# Altium PCB EthereCAT_to_CAN.PcbDoc (part 2 of 3)
Units mil, origin at the board's own origin, x right, y up, seen from the top; angles counter-clockwise.
Board outline 2515.04 x 1574.83 mil, 4 copper layers (Top Layer, L2-G, L3-V, Bottom Layer), stack 23.756 mil thick; 178 components, 102 nets, 583 pads, 389 vias.
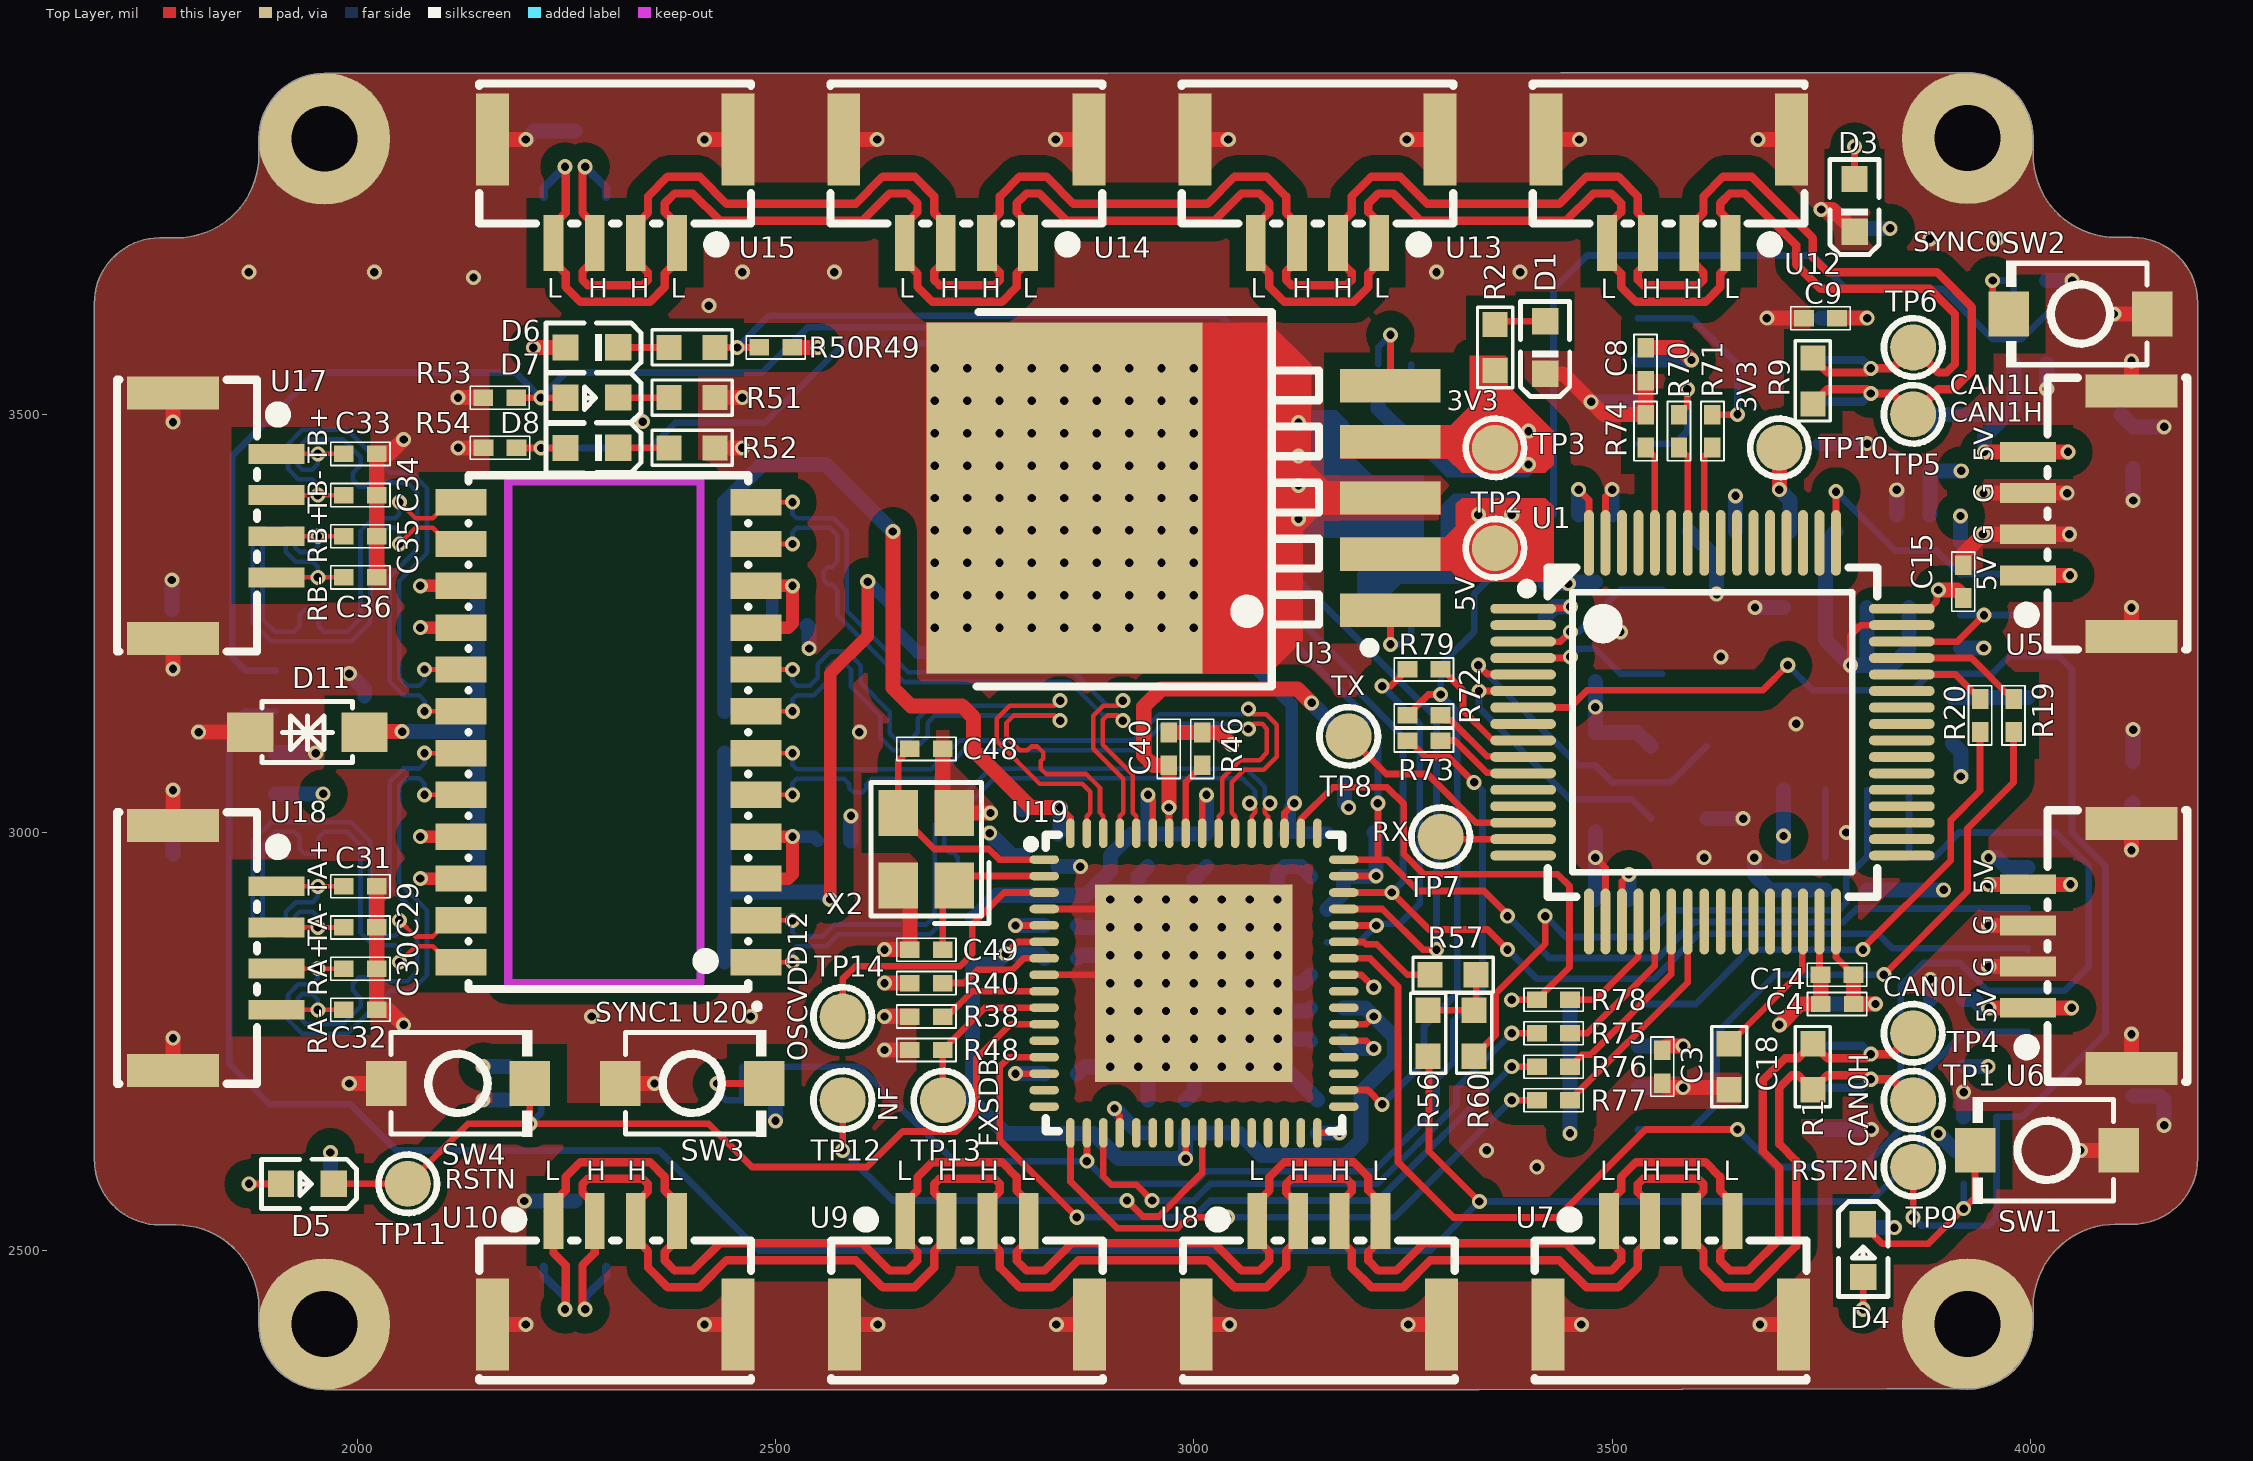
[diagram p0: Top Layer view]

## Via types
v1: diameter 18, hole 10, Top Layer to Bottom Layer, tented both sides, 389 vias

## Nets (pads, with @x,y where several pads share a name; then routed paths per layer and width w, separated by ;. In a path a pad name is that pad's centre, name@x,y a point inside that pad or via, vN(x,y) a via of type N, cw(c..) or ccw(c..) an arc to the next point about the centre after c; other vN are vias at no path point) (continued)
CAN0_L: (continued)
  Top Layer w10: v1(2248,2430) 2248.84,2430.84 2248.84,2482.71 2234.24,2497.31 U10.1@2234.24,2535.78 2234.24,2557.43 2248.84,2572.03 2248.84,2588.06 2266.72,2605.93 2349.59,2605.93 2367.27,2588.24 2367.27,2571.99 2381.88,2557.38 U10.4@2381.88,2535.78 2381.88,2513.21 2367.27,2498.6 2367.27,2488.07 2379.01,2476.33 2400.63,2476.33 2433.06,2508.77 2603.72,2508.77 2636.15,2476.33 2657.77,2476.33 2669.51,2488.07 2669.51,2498.6 2654.9,2513.21 U9.1@2654.91,2535.78 2654.91,2557.43 2669.51,2572.03 2669.51,2588.06 2687.38,2605.93 2770.25,2605.93 2787.94,2588.24 2787.94,2571.99 2802.55,2557.38 U9.4@2802.55,2535.78 2802.55,2513.21 2787.94,2498.6 2787.94,2488.07 2799.68,2476.33 2821.29,2476.33 2853.73,2508.77 3024.38,2508.77 3056.82,2476.33 3078.44,2476.33 3090.17,2488.07 3090.17,2498.6 3075.56,2513.21 U8.1@3075.57,2535.78 3075.57,2557.43 3090.18,2572.03 3090.18,2588.06 3108.05,2605.93 3190.92,2605.93 3208.6,2588.24 3208.6,2571.99 3223.21,2557.38 U8.4@3223.21,2535.78 3223.21,2513.21 3208.6,2498.6 3208.6,2488.07 3220.34,2476.33 3241.96,2476.33 3274.39,2508.77 3445.05,2508.77 3477.49,2476.33 3499.1,2476.33 3510.84,2488.07 3510.84,2498.6 3496.23,2513.21 U7.1@3496.24,2535.78 3496.24,2557.43 3510.85,2572.03 3510.85,2588.06 3528.72,2605.93 3611.59,2605.93 3629.27,2588.24 3629.27,2571.99 3643.88,2557.38 U7.4@3643.88,2535.78 3643.88,2513.21 3629.27,2498.6 3629.27,2488.07 3641.01,2476.33 3662.63,2476.33 3700,2513.7 3700,2599.14 3680,2619.14 3680,2703.28 3706.71,2730 3722.5,2730 R1.1@3740,2747.5 3757.5,2730 3804.4,2730 v1(3809.41,2735) 3835,2735 TP4.1@3860,2760
  Bottom Layer w10: U11.2@2222.6,2480.63 2222.6,2469.8 2248,2444.4 v1(2248,2430) ; U2.6@3749.15,2745 3799.41,2745 v1(3809.41,2735)
CAN0RX: R20.1 U2.4 | length 614.4
  Top Layer w8: v1(3800,2860) 3800,2861.87 3905,2966.87 3905,3015 3940,3050 R20.1@3940,3120.32
  Bottom Layer w8: U2.4@3530.85,2795 3600,2795 3665,2860 v1(3800,2860)
CAN0TX: R19.1 U2.1 | length 775.1
  Top Layer w8: v1(3825,2830) 3925,2930 3925,3005 3980,3060 R19.1@3980,3120.32
  Bottom Layer w8: U2.1@3530.85,2645 3595,2645 3625,2675 3625,2760 3695,2830 v1(3825,2830)
CAN1_H: R9.2 TP5.1 U4.7 U12.2 U12.3 U13.2 U13.3 U14.2 U14.3 U15.2 U15.3 U16.1 | length 3260.8
  Top Layer w10: v1(2272.01,3796.08) 2268.85,3792.92 2268.85,3740.97 2283.46,3726.36 2283.46,3685.47 2268.85,3670.87 2268.85,3660.71 2275.01,3654.55 2341.31,3654.55 2347.28,3660.52 2347.28,3669.73 2332.67,3684.34 U15.2@2332.67,3704.71 2332.67,3726.32 2347.28,3740.93 2347.28,3760.7 2370.73,3784.15 2408.92,3784.15 2441.35,3751.72 2595.44,3751.72 2627.88,3784.15 2666.06,3784.15 2689.52,3760.7 2689.52,3740.93 2704.13,3726.32 2704.13,3685.47 2689.52,3670.87 2689.52,3660.71 2695.68,3654.55 2761.98,3654.55 2767.95,3660.52 2767.95,3669.73 2753.34,3684.34 2753.34,3726.32 2767.95,3740.93 2767.95,3760.7 2791.4,3784.15 2823.51,3784.15 2855.94,3751.72 3016.11,3751.72 3048.54,3784.15 3086.73,3784.15 3110.18,3760.7 3110.18,3740.93 3124.79,3726.32 3124.79,3685.47 3110.19,3670.87 3110.19,3660.71 3116.34,3654.55 3182.65,3654.55 3188.61,3660.52 3188.61,3669.73 3174,3684.34 3174,3726.32 3188.61,3740.93 3188.61,3760.7 3212.07,3784.15 3246.62,3784.15 3279.05,3751.72 3436.78,3751.72 3469.21,3784.15 3507.4,3784.15 3530.85,3760.7 3530.85,3740.93 3545.46,3726.32 3545.46,3685.47 3530.86,3670.87 3530.86,3660.71 3537.01,3654.55 3603.31,3654.55 3609.28,3660.52 3609.28,3669.73 3594.67,3684.34 3594.67,3726.32 3609.28,3740.93 3609.28,3760.7 3632.74,3784.15 3666.62,3784.15 3740.01,3710.77 3740.01,3687.77 3757.78,3670 3888.28,3670 3930,3628.28 3930,3551.72 3908.28,3530 3890,3530 TP5.1@3860,3500 3835,3525 v1(3809.41,3525) 3804.41,3530 3757.5,3530 R9.2@3740,3512.5
  Bottom Layer w10: v1(2272.01,3796.08) 2297.41,3770.68 U16.1@2297.41,3759.85 ; U4.7@3749.15,3515 3799.41,3515 v1(3809.41,3525)
CAN1_L: R9.1 TP6.1 U4.6 U12.1 U12.4 U13.1 U13.4 U14.1 U14.4 U15.1 U15.4 U16.2 | length 3226.7
  Top Layer w10: v1(2248.01,3796.08) 2248.85,3795.24 2248.85,3740.97 2234.25,3726.37 2234.25,3683.05 2248.85,3668.45 2248.85,3652.43 2266.73,3634.55 2349.6,3634.55 2367.28,3652.24 2367.28,3668.49 2381.89,3683.1 2381.89,3727.27 2367.28,3741.88 2367.28,3752.41 2379.02,3764.15 2400.64,3764.15 2433.07,3731.72 2603.73,3731.72 2636.16,3764.15 2657.78,3764.15 2669.52,3752.41 2669.52,3741.88 2654.91,3727.27 2654.91,3704.71 2654.92,3683.05 2669.52,3668.45 2669.52,3652.43 2687.39,3634.55 2770.26,3634.55 2787.95,3652.24 2787.95,3668.49 2802.56,3683.1 2802.56,3727.27 2787.95,3741.88 2787.95,3752.41 2799.69,3764.15 2815.22,3764.15 2847.66,3731.72 3024.39,3731.72 3056.83,3764.15 3078.45,3764.15 3090.18,3752.41 3090.18,3741.88 3075.57,3727.27 U13.4@3075.57,3704.71 ; U13.4@3075.58,3704.71 3075.58,3683.05 3090.19,3668.45 3090.19,3652.43 3108.06,3634.55 3190.93,3634.55 3208.61,3652.24 3208.61,3668.49 3223.22,3683.1 3223.22,3727.27 3208.61,3741.88 3208.61,3752.41 3220.35,3764.15 3238.34,3764.15 3270.77,3731.72 3445.06,3731.72 3477.5,3764.15 3499.11,3764.15 3510.85,3752.41 3510.85,3741.88 3496.24,3727.27 3496.24,3704.71 3496.25,3683.05 3510.86,3668.45 3510.86,3652.43 3528.73,3634.55 3611.6,3634.55 3629.28,3652.24 3629.28,3668.49 3643.89,3683.1 3643.89,3727.27 3629.28,3741.88 3629.28,3752.41 3641.02,3764.15 3658.34,3764.15 3720.01,3702.48 3720.01,3679.49 3749.5,3650 3880,3650 3910,3620 3910,3560 3900,3550 3890,3550 TP6.1@3860,3580 3835,3555 v1(3809.41,3555) 3804.4,3550 3757.5,3550 R9.1@3740,3567.5
  Bottom Layer w10: U16.2@2222.61,3759.85 2222.61,3770.68 v1(2248.01,3796.08) ; U4.6@3749.15,3565 3799.41,3565 v1(3809.41,3555)
CAN1RX: R71.1 U4.4 | length 232.1
  Top Layer w8: R71.1@3620,3499.68 3649.68,3499.68 v1(3650,3500)
  Bottom Layer w8: U4.4@3530.85,3615 3595,3615 3650,3560 v1(3650,3500)
CAN1TX: R70.1 U4.1 | length 149.8
  Top Layer w8: R70.1@3580,3499.68 3590,3509.68 v1(3590,3530)
  Bottom Layer w8: U4.1@3530.85,3465 3575,3465 3590,3480 v1(3590,3530)